# Altium PCB module-BGA_RG-4layers_v1.0.PcbDoc (part 1 of 3)
Units mm, origin at the board's own origin, x right, y up, seen from the top; angles counter-clockwise.
Board outline 20 x 20 mm, 4 copper layers (Top Layer, Signal Layer 1, Signal Layer 2, Bottom Layer), stack 1.546 mm thick; 75 components, 77 nets, 282 pads, 367 vias.
Unrouted connection lines stored in the file: 143.
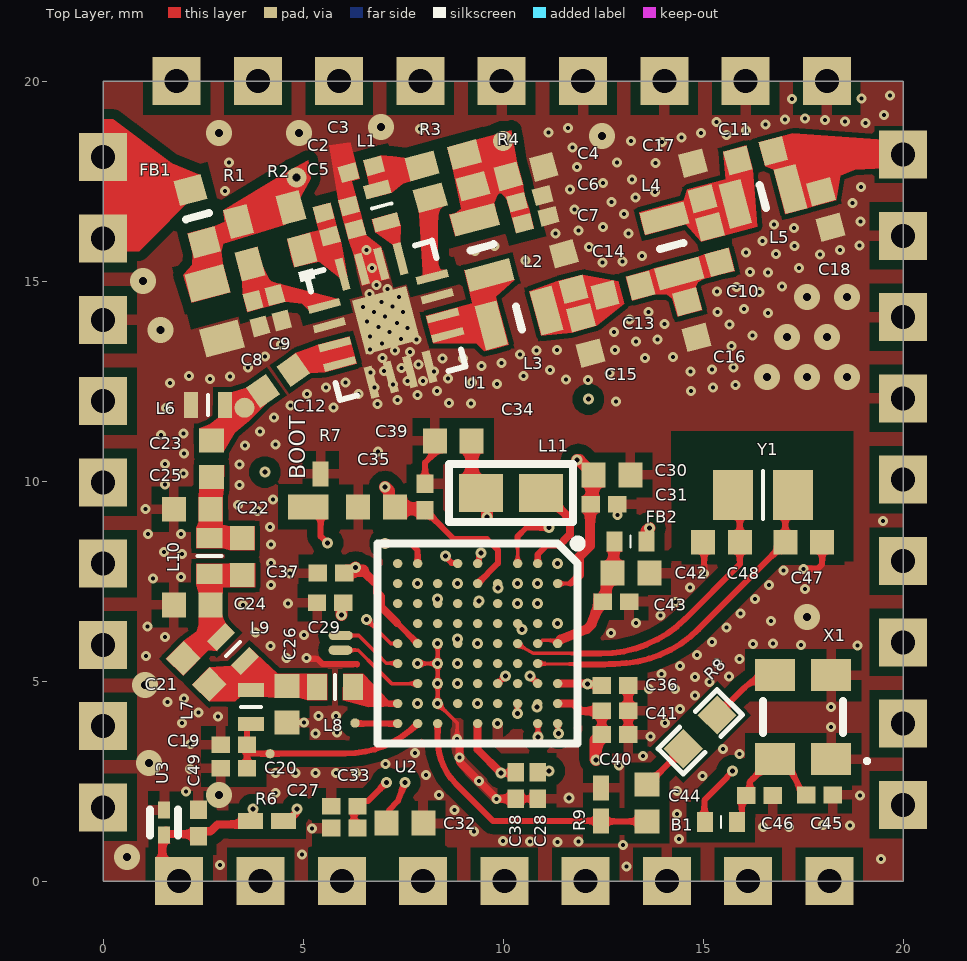
[diagram p0: Top Layer view]
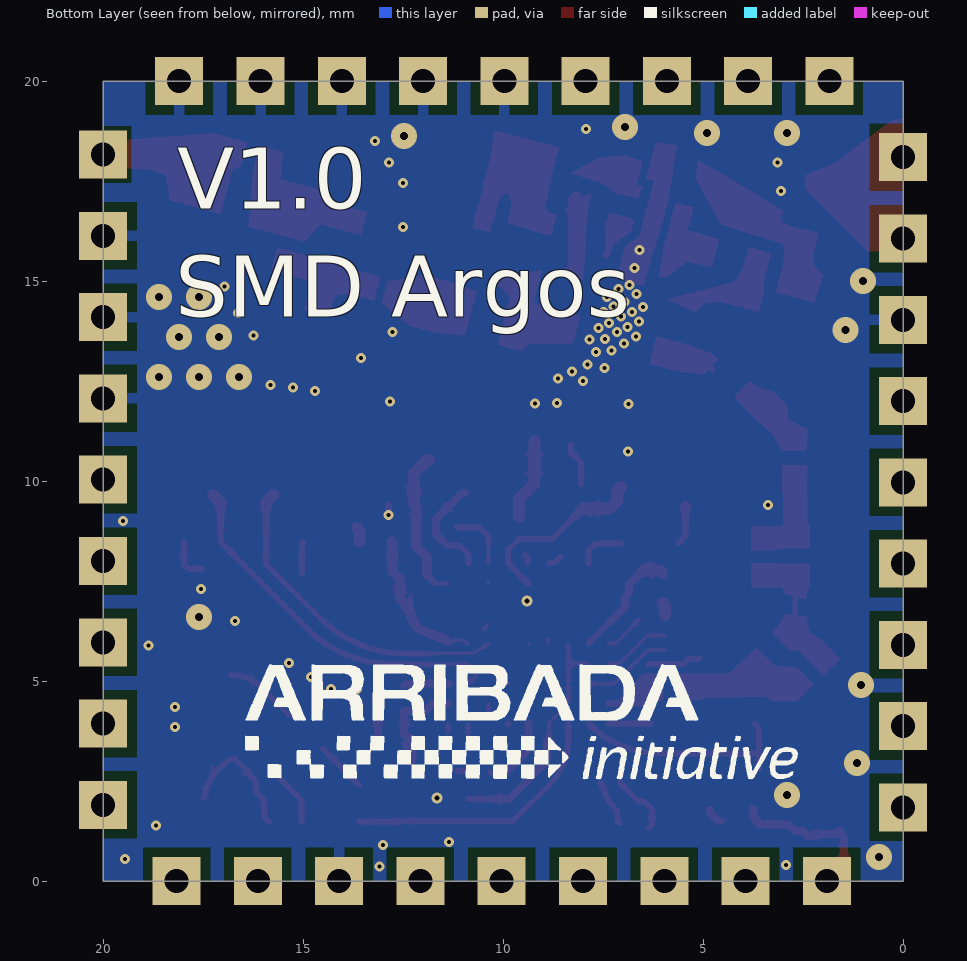
[diagram p1: Bottom Layer view, seen from below]
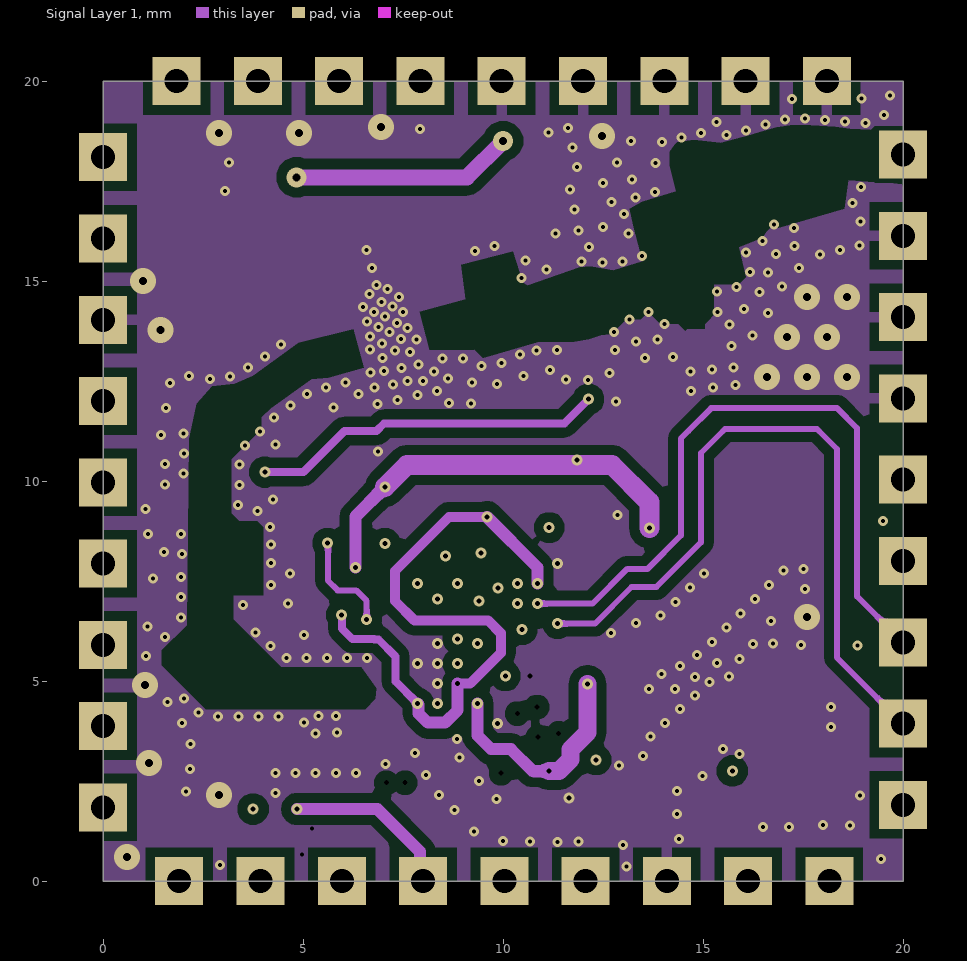
[diagram p2: Signal Layer 1]
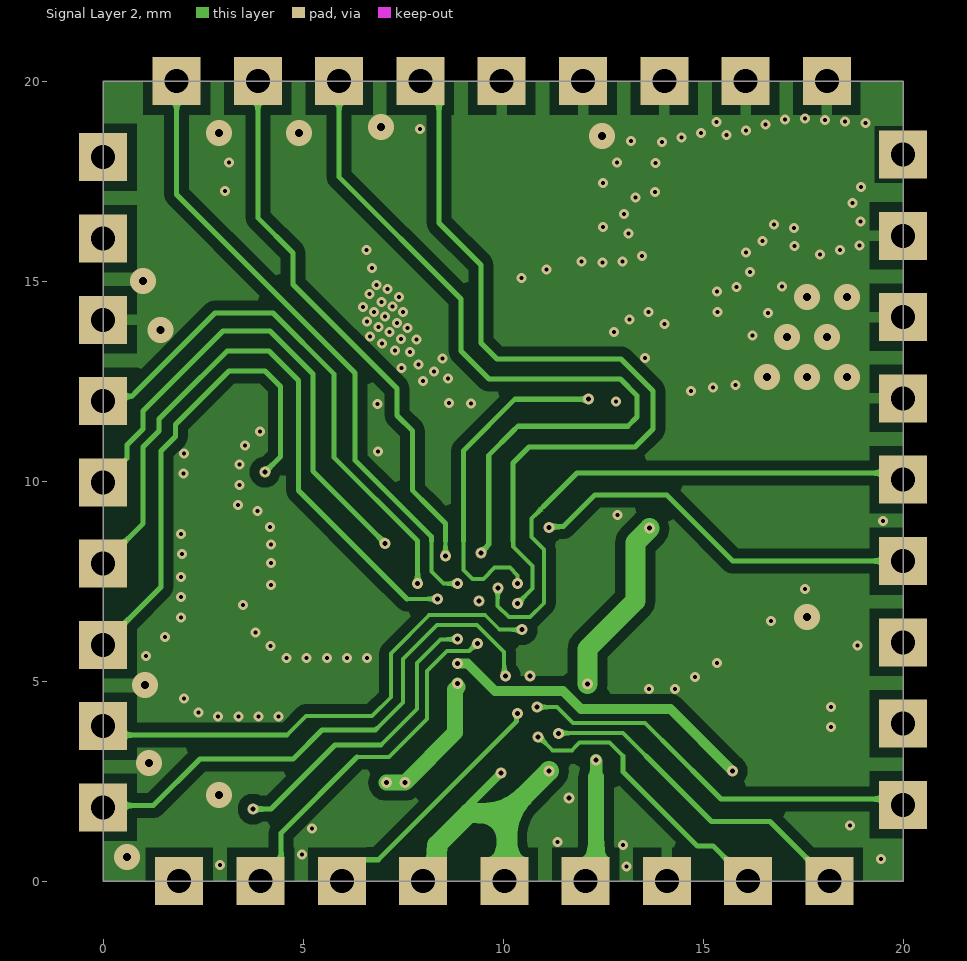
[diagram p3: Signal Layer 2]

## Layer stack, top to bottom
Top Solder: solder mask 0.02, Solder Resist, Dk 3.5
Top Layer: signal copper 0.035
Dielectric 1: prepreg 0.0705, PP-010, Dk 4
Signal Layer 1: signal copper 0.035
Dielectric 2: core 1.265, Core-002, Dk 4
Signal Layer 2: signal copper 0.035
Dielectric 3: prepreg 0.0705, PP-010, Dk 4
Bottom Layer: signal copper 0.035
Bottom Solder: solder mask 0.02, Solder Resist, Dk 3.5

## Board outline
0,0 20,0 20,20 0,20

## Design rules (kind name [scope] priority, off if disabled: settings)
BoardOutlineClearance [All] p1 off: gap=0.6 ignorepadtopadclearanceinfootprint=FALSE
Clearance Clearance_tab [(ObjectKind = 'Pad') And (Name Like 'Tab*-*') vs OnLayer('Keep-Out Layer')] p1: gap=0 ignorepadtopadclearanceinfootprint=TRUE
Clearance Clearance_RF_Polygon [InNetClass('50Ohms') vs InPolygon] p2: gap=0.12 ignorepadtopadclearanceinfootprint=TRUE
Clearance PairDiff [InNet('RFI_N') vs InNet('RFI_P')] p3: gap=0.1 ignorepadtopadclearanceinfootprint=TRUE
Clearance Clearance_1 [OnLayer('MidLayer 1')       and InPolygon vs All    and WithinRoom('RoomDefinition_BGA')] p4: gap=0.15 ignorepadtopadclearanceinfootprint=TRUE
Clearance Clearance_Via_BGA [TouchesRoom('RoomDefinition_BGA') vs isvia or ispad or istrack] p5: gap=0.085 ignorepadtopadclearanceinfootprint=TRUE except(0.09: Track-Track Track-Via; 0.1: Track-Poly Track-Region; 0.11: Arc-Via SMDPad-Via THPad-Via Via-Via; 0.12: Arc-Track; 0.15: Arc-Region SMDPad-Region THPad-Region Via-Fill Via-Poly Via-Region Fill-Hole Poly-Hole Region-Region; 0.24: Arc-Fill Arc-Poly Track-Fill SMDPad-Fill SMDPad-Poly THPad-Fill THPad-Poly Fill-Fill Fill-Poly Fill-Region Fill-Text Poly-Poly Poly-Region Poly-Text Region-Text Region-Hole)
Clearance Clearance_Via_BGA_Inner [TouchesRoom('RoomDefinition_BGA') and (OnLayer('MidLayer 1')) vs isvia or ispad or istrack] p6: gap=0.25 ignorepadtopadclearanceinfootprint=TRUE except(0.075: Track-Track Track-Via; 0.085: Arc-Arc Arc-SMDPad Arc-THPad Arc-Text Arc-Hole Track-SMDPad Track-THPad Track-Text Track-Hole SMDPad-SMDPad SMDPad-THPad SMDPad-Text SMDPad-Hole THPad-THPad THPad-Text THPad-Hole Via-Text Via-Hole Text-Text Text-Hole; 0.11: Arc-Via SMDPad-Via THPad-Via Via-Via; 0.12: Arc-Track; 0.15: Arc-Region Track-Region SMDPad-Region THPad-Region Via-Region Region-Region)
Clearance Clearance_via_to_via [(ObjectKind = 'Via') And (Net <> 'GND') vs (ObjectKind = 'Via') And (Net <> 'GND')] p7: gap=0.65 ignorepadtopadclearanceinfootprint=TRUE
Clearance "Clearance_Polygon to All" [InPolygon] p8: gap=0.25 ignorepadtopadclearanceinfootprint=TRUE
Clearance [All] p9: gap=0.12 ignorepadtopadclearanceinfootprint=TRUE except(0.25: Arc-Via Track-Via SMDPad-Via THPad-Via Via-Fill Via-Poly Via-Region)
ComponentClearance CASTELLATED_COL [(InComponent('J1') OR InComponent('J2') OR InComponent('J3') OR InComponent('J4'))] p1: gap=0 collisioncheckmode=3 verticalgap=0 showdistances=FALSE
ComponentClearance [All] p2: gap=0 collisioncheckmode=3 verticalgap=0.1 showdistances=FALSE
DiffPairsRouting [InDifferentialPair('RFI')] p1: maxlimit=0.2 minlimit=0.111 mostfreqgap=0.111 toplayer_minwidth=0.1 toplayer_maxwidth=0.145 toplayer_prefwidth=0.1 midlayer1_minwidth=0.1 midlayer1_maxwidth=0.145 midlayer1_prefwidth=0.1 midlayer2_minwidth=0.1 midlayer2_maxwidth=0.145 midlayer2_prefwidth=0.1 bottomlayer_minwidth=0.1 bottomlayer_maxwidth=0.145 bottomlayer_prefwidth=0.1 maxuncoupledlength=12.7
HoleSize [All] p1: absolutevalues=TRUE maxlimit=10 minlimit=0.025 maxpercent=80.000 minpercent=20.000
HoleToHoleClearance [All] p1: gap=0.1 allowstackedmicrovias=TRUE
MaxMinImpedance "Schematic Impedance Constraint" [InNetClass('50Ohms')] p1: minimum=50.00 maximum=50.00
MaximumViaCount [All] p1: limit=3
MinimumSolderMaskSliver [All] p1: minsoldermaskwidth=0.1
PlaneClearance PlaneClearance_1 [InNet('GND')] p1: clearance=0
PlaneClearance [All] p2: clearance=0.508
PlaneConnect [InNet('GND')] p1: planeconnectstyle=Direct reliefexpansion=0.508 reliefentries=4 reliefconductorwidth=0.21 reliefairgap=0.21
PolygonConnect PolygonConnectGnd [InNet('GND') vs InPolygon] p1: connectstyle=Direct reliefconductorwidth=0.254 reliefentries=4 polygonreliefangle="90 Angle" airgapwidth=0.254
PolygonConnect PolygonConnect_RF [(ObjectKind = 'Pad')    and       TouchesRoom('RF_ARTIC')] p2: connectstyle=Direct reliefconductorwidth=0.254 reliefentries=4 polygonreliefangle="90 Angle" airgapwidth=0.254
PolygonConnect PolygonConnect_J1 [(ObjectKind = 'Pad') And (Name = 'J1-2')] p3: connectstyle=Direct reliefconductorwidth=0.254 reliefentries=4 polygonreliefangle="90 Angle" airgapwidth=0.254
PolygonConnect PolygonConnect_All [All] p4: thpad.connectstyle=Relief thpad.reliefconductorwidth=0.25 thpad.reliefentries=4 thpad.polygonreliefangle="90 Angle" thpad.airgapwidth=0.25 smdpad.connectstyle=Relief smdpad.reliefconductorwidth=0.25 smdpad.reliefentries=4 smdpad.polygonreliefangle="90 Angle" smdpad.airgapwidth=0.25 via.connectstyle=Direct via.reliefconductorwidth=0.2 via.reliefentries=4 via.polygonreliefangle="90 Angle" via.airgapwidth=0.25
RoomDefinition RF_ARTIC [InComponentClass('RF_ARTIC')] p1: confinementstyle=ConfineIn formatcopy=TRUE lockcomponents=FALSE outline 0.85,18.944 0.862,18.957 18.856,18.957 18.95,18.85 18.95,12.166 18.144,11.25 1.196,11.25 0.85,11.643 0.85,14.749
RoomDefinition RoomDefinition_BGA [False] p2: confinementstyle=ConfineIn formatcopy=TRUE lockcomponents=FALSE outline 6.851,8.49 6.861,8.5 11.9,8.5 11.9,3.4 6.85,3.4
RoomDefinition STM32 [InComponentClass('STM32')] p3: confinementstyle=ConfineIn formatcopy=TRUE lockcomponents=FALSE outline 19.994,0.01 19.994,11.5 0,11.5 0,0.01
RoutingLayers "RoutingLayers_90 Ohms" [InDifferentialPairClass('All Differential Pairs')] p1: top layer_v5=TRUE mid layer 1_v5=TRUE mid layer 2_v5=TRUE bottom layer_v5=TRUE
RoutingLayers [All] p2: top layer_v5=TRUE mid layer 1_v5=TRUE mid layer 2_v5=TRUE bottom layer_v5=TRUE
RoutingVias RoutingVias_BGA [InDrillLayerPair('Top Layer - MidLayer 1')] p1: holewidth=0.125 width=0.25 viastyle="Through Hole" minholewidth=0.125 minwidth=0.23 maxholewidth=0.125 maxwidth=0.27
RoutingVias [All] p2: holewidth=0.2 width=0.65 viastyle="Through Hole" minholewidth=0.1 minwidth=0.2 maxholewidth=0.2 maxwidth=0.65
ShortCircuit [(ObjectKind = 'Via') And (DrillPair = 'Top Layer - MidLayer 1') vs Ispad] p1: allowed=TRUE
SilkToSilkClearance [All] p1: silktosilkclearance=0
SilkToSolderMaskClearance [IsPad] p1: minsilkscreentomaskgap=0.1 clearancetoexposedcopper=TRUE
SolderMaskExpansion SolderMaskExpansion_VIA [IsVia] p1: expansion=-0.2 istentingtop=FALSE
SolderMaskExpansion [All] p2: expansion=0 istentingtop=FALSE
UnRoutedNet [All] p1: checkbadconnections=TRUE
Width Width_50Ohms [InNetClass('50Ohms')] p1: maxlimit=0.709 minlimit=0.065 preferedwidth=0.3 toplayer_minwidth=0.1 toplayer_prefwidth=0.606 impedanceprofiledriven=TRUE impedanceprofileid={08010320-1712-4E40-B560-D84C871F8A27} impedanceprofilevalue=50.000000 minimp=50.000000 maximp=50.000000 favimp=50.000000
Width Width_GPIO [InNetClass('PA[0..15]') or InNetClass('PB[0..15]')or InNetClass('Pc[0..15]')] p2: maxlimit=0.254 minlimit=0.08 preferedwidth=0.127 minimp=50.000000 maximp=50.000000 favimp=50.000000
Width Width_BGA [OnLayer('Top Layer')      and WithinRoom('RoomDefinition_BGA')] p3: maxlimit=0.35 minlimit=0.075 preferedwidth=0.1 toplayer_minwidth=0.08 toplayer_prefwidth=0.09 midlayer1_maxwidth=0.1 midlayer2_minwidth=0.09 midlayer2_maxwidth=0.1 bottomlayer_minwidth=0.09 bottomlayer_maxwidth=0.1 minimp=50.000000 maximp=50.000000 favimp=50.000000
Width Width_ALIMS [InNetClass('VDD') and InNetClass('VDDPA') and InNetClass('VBAT')] p4: maxlimit=10 minlimit=0.15 preferedwidth=0.35 minimp=50.000000 maximp=50.000000 favimp=50.000000
Width Width_GR_POW [WithinRoom('RF_ARTIC') And TouchesRoom('RF_ARTIC')] p5: maxlimit=10 minlimit=0.127 preferedwidth=0.3 toplayer_minwidth=0.2 bottomlayer_minwidth=0.2 minimp=50.000000 maximp=50.000000 favimp=50.000000
Width Width_GND [InNet('VSSSMPS')] p6: maxlimit=10 minlimit=0.12 preferedwidth=0.3 midlayer1_minwidth=0.2 midlayer2_minwidth=0.2 bottomlayer_minwidth=0.2 minimp=50.000000 maximp=50.000000 favimp=50.000000
Width [All] p7: maxlimit=2 minlimit=0.075 preferedwidth=0.15 toplayer_minwidth=0.08 toplayer_maxwidth=1.5 midlayer1_maxwidth=1 midlayer2_minwidth=0.1 bottomlayer_minwidth=0.1 bottomlayer_maxwidth=1.5 minimp=50.000000 maximp=50.000000 favimp=50.000000
18 further rules are at their usual default settings.

## Classes and differential pairs
net class GR_EN: NetC2_1 NetC8_2 V_EN1
component class STM32: B1 C35 C36 C37 C38 C39 C40 C41 C42 C43 C44 C45 C46 C47 C48 C49 FB2 R8 R9 U2 U3 X1 Y1
component class U_STM32RF_power_SMPS: C27 C28 C29 C30 C31 C32 C33 C34 L11
component class RF_ARTIC: ala C2 C3 C4 C5 C6 C7 C8 C9 C10 C11 C12 C13 C14 C15 C16 C17 C18 FB1 L1 L2 L4 L5 L6 R1 R2 R3 R4
component class U_module-BGA-RG: C19 C20 C21 C22 C23 C24 C25 C26 L7 L8 L9 L10 R6 R7
net class PC[0..15]: PC0 PC1 PC2 PC3 PC4 PC5 PC6 PC7 PC8 PC9 PC10 PC11 PC12 PC13 PC14 PC15
net class PB[1..15]: PB1 PB2 PB3 PB4 PB5 PB6 PB7 PB8 PB9 PB10 PB11 PB12 PB13 PB14 PB15
net class PA[0..15]: PA0 PA1 PA2 PA3 PA4 PA5 PA6 PA7 PA8 PA9 PA10 PA11 PA12 PA13 PA14 PA15
net class 50Ohms: ANT_ARGOS_2 GRF_IN_4 GRF_OUT_4 NetC10_1 NetC10_2 NetC13_1 NetC21_1 NetC21_2 NetC22_2 RFIN RFO_LP

## Components (designator, comment, footprint, x,y, rotation, side; value= is the part's Value field where it differs from the comment)
B1 "1000u@100MHz" NFZ15SG152SN10B 15.445,1.472 r180 top
C2 "100nF" CAPC0603X33N 5.832,16.791 r15 top
C3 "100nF" CAPC0603X33N 6.456,17.795 r195 top
C4 "1uF" CAPC1005X55N 10.571,17.737 r15 top
C5 "100pF" CAPC0603X33N 5.988,16.208 r15 top
C6 "100nF" CAPC0603X33N 10.673,17.054 r15 top
C7 "100pF" CAPC0603X33N 10.817,16.531 r15 top
C8 "100nF" CAPC0603X33N 3.836,14.186 r105 top
C9 "100pF" CAPC0603X33N 4.381,14.332 r105 top
C10 "GRM1555C1H4R3BA01D" CAPC1005X55N 15.297,15.909 r105 top value=4.3pF
C11 "GRM1555C1E3R9BA01D" CAPC1005X55N 16.315,18.131 r15 top value=3.9pF
C12 "20pF" CAPC1005X55N 4.377,12.514 r35 top
C13 "GCM1555C1H101JA16D" CAPC1005X55N 12.993,14.771 r15 top value=100pF
C14 "20pF" CAPC1005X55N 11.638,15.237 r105 top
C15 "GCM1555C1H8R2CA16J" CAPC1005X55N 12.065,13.643 r105 top value=8.2pF
C16 "CAP-NC-0402" CAPC1005X55N 14.716,14.038 r105 top value=NC
C17 "GRM1555C1E6R8BA01D" CAPC1005X55N 14.87,17.503 r285 top value=6.8pF
C18 "GRM1555C2A2R7CA01D" CAPC1005X55N 18.068,16.788 r105 top value=2.7pF
C19 "100nF" CAPC0603X33N 3.27,3.405 r0 top (schematic designator C1)
C20 "100pF" CAPC0603X33N 3.27,2.818 r0 top (schematic designator C2)
C21 "GRM1555C1H4R3BA01D" CAPC1005X55N 2.332,5.243 r135 top value=4.3pF (schematic designator C3)
C22 "CAP-NC-0402" CAPC1005X55N 3.479,8.111 r90 top value=NC (schematic designator C4)
C23 "GCM1555C1H101JA16D" CAPC1005X55N 2.713,10.558 r90 top value=100pF (schematic designator C5)
C24 "GCM1555C1H120GA16D" CAPC1005X55N 2.232,6.903 r0 top value=12pF (schematic designator C6)
C25 "GCM1555C1H8R2CA16J" CAPC1005X55N 2.232,9.296 r0 top value=8.2pF (schematic designator C7)
C26 "GRM1555C1H130GA01D" CAPC1005X55N 4.6,4.42 r90 top value=13pF (schematic designator C8)
C27 "100pF" CAPC0603X33N 6.031,1.87 r0 top (schematic designator C1)
C28 "GRM033R61C104KE14D" CAPC0603X33N 10.87,2.386 r270 top value=100nF (schematic designator C2)
C29 "GRM033R61C104KE14D" CAPC0603X33N 5.679,6.956 r180 top value=100nF (schematic designator C3)
C30 "GRM155Z71A225KE44D" CAPC1005X55N 12.726,10.152 r0 top value=2.2uF (schematic designator C4)
C31 "100nF" CAPC0603X33N 12.526,9.418 r180 top (schematic designator C5)
C32 "1uF" CAPC1005X55N 7.55,1.45 r180 top (schematic designator C6)
C33 "100nF" CAPC0603X33N 6.031,1.324 r0 top (schematic designator C7)
C34 "0.47uF" CAPC1005X55N 8.753,11.004 r180 top value=470nF (schematic designator C8)
C35 "GRM155Z71A225KE44D" CAPC1005X55N 6.84,9.35 r0 top value=2.2uF (schematic designator C1)
C36 "100nF" CAPC0603X33N 12.8,4.89 r180 top (schematic designator C2)
C37 "100nF" CAPC0603X33N 5.7,7.7 r0 top (schematic designator C3)
C38 "100nF" CAPC0603X33N 10.32,2.386 r90 top (schematic designator C4)
C39 "100nF" CAPC0603X33N 8.05,9.6 r270 top (schematic designator C5)
C40 "1uF" CAPC0603X35N 12.8,3.66 r180 top (schematic designator C6)
C41 "100nF" CAPC0603X33N 12.8,4.255 r0 top (schematic designator C7)
C42 "GRM155Z71A225KE44D" CAPC1005X55N 13.2,7.7 r180 top value=2.2uF (schematic designator C8)
C43 "100nF" CAPC0603X33N 12.826,6.983 r180 top (schematic designator C9)
C44 "10pF" CAPC1005X55N 13.6,1.95 r270 top (schematic designator C10)
C45 "1uF" CAPC0603X35N 17.912,2.152 r0 top (schematic designator C11)
C46 "100nF" CAPC0603X33N 16.411,2.136 r0 top (schematic designator C12)
C47 "5.1pF" CAPC1005X55N 17.518,8.47 r180 top (schematic designator C13)
C48 "5.1pF" CAPC1005X55N 15.461,8.47 r0 top (schematic designator C14)
C49 "100nF" CAPC0603X33N 2.383,1.45 r270 top (schematic designator C15)
FB1 "BLM15PE800SH1D" BLM18EG121SH1D 2.359,16.621 r285 top
FB2 "600R@100MHz" NFZ15SG152SN10B 13.186,8.488 r180 top (schematic designator FB1)
L1 "10nH" LQG15WH0N7B02D 6.968,16.879 r105 top
L2 "24nH" LQW18AN10NG80D 9.477,15.843 r285 top
L3 "LQW18AN5N6C80D" LQW18AN10NG80D 10.396,14.076 r15 top value=5.6nH
L4 "10nH" LQW18AN10NG80D 14.219,15.878 r105 top
L5 "10nH" LQW18AN10NG80D 16.494,17.114 r15 top
L6 "10nH" LQG15WH0N7B02D 2.625,11.9 r0 top
L7 "LQG15HN68NJ02D" LQG15WH0N7B02D 3.7,4.35 r90 top value=68nH (schematic designator L1)
L8 "LQG15WZ11NJ02D" LQW15CNR20J00B 5.8,4.85 r180 top value=11nH (schematic designator L2)
L9 "10nH" LQG15WH0N7B02D 3.253,5.801 r135 top (schematic designator L3)
L10 "LQG15WH20NJ02D" LQW15CNR20J00B 2.662,8.125 r90 top value=20nH (schematic designator L4)
L11 "MLZ1608M150WT000" INDC1608X95N 10.2,9.7 r180 top value=15µH (schematic designator L1)
R1 "2.4K" RESC1005X40N 3.53,15.959 r105 top value=2.4kR
R2 "5.42K" RESC1005X40N 4.84,16.312 r105 top value=5.42kR
R3 "0R" RESC1005X40N 8.503,18.02 r15 top value=0mR
R4 "0R" RESC1005X40N 8.712,17.226 r15 top value=0mR
R6 "100K" RESC0603X28N 4.1,1.5 r180 top (schematic designator R2)
R7 "100K" RESC0603X28N 5.44,9.765 r270 top (schematic designator R3)
R8 "220R" 0402 15.375,4.175 r225 top (schematic designator R1)
R9 "10K" RESC0603X28N 12.45,1.914 r270 top value=10kR (schematic designator R2)
U1 "GRF5504" QFN-16_3MM_GRF 7.075,14.016 r15 top
U2 "STM32WL55JCI7_details" BGA73C50P9X9_500X500X60 9.366,5.937 r270 top (schematic designator U1)
U3 "ESD_6V" DIOM0603X03N 1.53,1.467 r90 top (schematic designator U2)
X1 "TG2520SMN_32.0000M-MCGNNM0" TG2520SMN320000MMCGNNM0 17.5,4.1 r90 top
Y1 "NX2012SA-32.768K-STD-MUB-1" NX2012SA32768KSTDMUB1 16.5,9.65 r180 top

## Footprints (in the part's own frame and the unit in brackets; to place one, negate y for a bottom-side part, rotate by r counter-clockwise, add the part's x,y. Pads: shape width x height; smd on the part's side, far side on the other; paste and mask are expansions set on the pad)
0402 [mm]
  rect 0.7x0.7 smd: 1(0.035,0) 2(1.233,0)
  silkscreen extent -0.41,-0.45 1.67,0.45, body extent -0.38,-0.36 1.65,0.36, height 0.82
BGA73C50P9X9_500X500X60 [mm]
  round 0.232 smd mask+0.02: A1(-2,2) A2(-1.5,2) A4(-0.5,2) A5(0,2) A7(1,2) A8(1.5,2) A9(2,2) B1(-2,1.5) B2(-1.5,1.5) B3(-1,1.5) B4(-0.5,1.5) B5(0,1.5) B6(0.5,1.5) B7(1,1.5) B8(1.5,1.5) B9(2,1.5) C1(-2,1) C2(-1.5,1) C3(-1,1) C4(-0.5,1) C5(0,1) C6(0.5,1) C7(1,1) C8(1.5,1) D2(-1.5,0.5) D3(-1,0.5) D4(-0.5,0.5) D5(0,0.5) D6(0.5,0.5) D7(1,0.5) D8(1.5,0.5) D9(2,0.5) E1(-2,0) E2(-1.5,0) E3(-1,0) E4(-0.5,0) E5(0,0) E6(0.5,0) E7(1,0) E8(1.5,0) E9(2,0) F1(-2,-0.5) F2(-1.5,-0.5) F3(-1,-0.5) F4(-0.5,-0.5) F5(0,-0.5) F6(0.5,-0.5) F7(1,-0.5) F8(1.5,-0.5) G2(-1.5,-1) G3(-1,-1) G4(-0.5,-1) G5(0,-1) G6(0.5,-1) G7(1,-1) G8(1.5,-1) G9(2,-1) H1(-2,-1.5) H2(-1.5,-1.5) H3(-1,-1.5) H4(-0.5,-1.5) H5(0,-1.5) H6(0.5,-1.5) H7(1,-1.5) H8(1.5,-1.5) H9(2,-1.5) J1(-2,-2) J2(-1.5,-2) J3(-1,-2) J5(0,-2) J6(0.5,-2) J8(1.5,-2) J9(2,-2)
  silkscreen extent -2.6,-2.5 2.5,2.6, body extent -2.5,-2.5 2.5,2.5, height 0.6
BLM18EG121SH1D [mm]
  rect 0.65x0.7 smd: 1(-0.675,0) 2(0.675,0)
  silkscreen extent 0,-0.3 0,0.3, body extent -0.8,-0.4 0.8,0.4, height 0.8
CAPC0603X33N [mm]
  rect 0.46x0.42 smd: 1(-0.33,0) 2(0.33,0)
  body extent -0.3,-0.15 0.3,0.15, height 0.33
CAPC0603X35N [mm]
  rect 0.46x0.42 smd: 1(-0.33,0) 2(0.33,0)
  body extent -0.3,-0.15 0.3,0.15, height 0.35
CAPC1005X55N [mm]
  rect 0.6x0.62 smd: 1(-0.46,0) 2(0.46,0)
  body extent -0.5,-0.25 0.5,0.25, height 0.55
DIOM0603X03N [mm] "Molded Diode, 2-Leads, Body 0.60x0.30mm"
  rect 0.425x0.3 smd: 1(-0.313,0) 2(0.312,0)
  silkscreen extent -0.32,-0.35 0.32,0.35, body extent -0.32,-0.18 0.33,0.18, height 0.33
INDC1608X95N [mm] "Chip Inductor, 2-Leads, Body 1.75x0.95x0.95mm (0603)"
  rect 1.1x0.95 smd: 1(-0.75,0) 2(0.75,0)
  silkscreen extent -1.55,-0.73 1.55,0.72, body extent -0.8,-0.48 0.8,0.47, height 0.8
LQG15WH0N7B02D [mm]
  rect 0.35x0.65 smd: 1(-0.425,0) 2(0.425,0)
  silkscreen extent 0,-0.25 0,0.25, body extent -0.5,-0.25 0.5,0.25, height 0.55
LQW15CNR20J00B [mm]
  rect 0.5x0.66 smd: 1(-0.45,0) 2(0.45,0)
  silkscreen extent 0,-0.3 0,0.3, body extent -0.5,-0.25 0.5,0.25, height 0.6
LQW18AN10NG80D [mm]
  rect 0.57x1.15 smd: 1(-0.715,0) 2(0.715,0)
  silkscreen extent 0,-0.3 0,0.3, body extent -0.83,-0.5 0.82,0.49, height 0.9
NFZ15SG152SN10B [mm]
  rect 0.4x0.5 smd: 1(-0.4,0) 2(0.4,0)
  silkscreen extent 0,-0.15 0,0.15, body extent -0.5,-0.25 0.5,0.25, height 0.5
NX2012SA32768KSTDMUB1 [mm]
  rect 1x1.25 smd: 1(-0.75,0) 2(0.75,0)
  silkscreen extent 0,-0.6 0,0.6, body extent -1.02,-0.6 1.03,0.6, height 0.55
QFN-16_3MM_GRF [mil]
  rect 32x8 smd paste+0 mask+1.18: 1(-55,29.53) 2(-55,9.84) 3(-55,-9.84) 4(-55,-29.53) 9(55,-29.53) 10(55,-9.84) 11(55,9.84) 12(55,29.53)
  rect 8x32 smd paste+0 mask+1.18: 5(-29.53,-55) 6(-9.84,-55) 7(9.84,-55) 8(29.53,-55) 13(29.53,55) 14(9.84,55) 15(-9.84,55) 16(-29.53,55)
  rect 55x55 smd paste+0 mask+0: 17(0,0)
  silkscreen extent -71,-64 64,68, body extent -59,-59 59,59, height 35
RESC0603X28N [mm]
  rect 0.625x0.4 smd: 1(-0.412,0) 2(0.412,0)
  body extent -0.3,-0.15 0.3,0.15, height 0.28
RESC1005X40N [mm]
  rect 0.75x0.6 smd: 1(-0.55,0) 2(0.55,0)
  body extent -1,0 0,0.35, height 0.5
TG2520SMN320000MMCGNNM0 [mm]
  rect 0.8x1 smd: 1(-1.05,-0.7) 2(1.05,-0.7) 3(1.05,0.7) 4(-1.05,0.7)
  silkscreen extent -1.15,-1.65 0.4,1, body extent -1.37,-1.12 1.37,1.12, height 0.9

## Part data
B1: library part BLM15HG102SZ1D, "Ferrite Bead - BLM15_Z1D Series EMI Suppression Filter 1000+/-25% at 100MHz 250mA @85", Manufacturer_Name="Murata Electronics", Mouser Part Number=81-BLM15HG102SZ1D, Datasheet Link=http://www.murata.com/~/media/webrenewal/support/library/catalog/products/emc/emifil/c31e.ashx?la=en-gb, Geometry.Height=0.55mm, Manufacturer_Part_Number=BLM15HG102SZ1D, Mouser Price/Stock=https://www.mouser.co.uk/ProductDetail/Murata-Electronics/BLM15HG102SZ1D?qs=lEfY3O89Aqlr%2F6qMRIRYKQ%3D%3D
C2 C3 C6 C8 C19 C31 C33 C36 C37 C38 C39 C41 C43 C46 C49: library part GRM033Z71C104KE14D, "Multilayer Ceramic Capacitors MLCC - SMD/SMT .1UF     16V   10%        0201", Case/Package=0201, Manufacturer 1=Murata, Manufacturer_Name="Murata Electronics", Mouser Part Number=81-GRM033Z71C104KE4D, Category 1="Ceramic Capacitors", Datasheet Link=http://www.murata.com/~/media/webrenewal/support/library/catalog/products/capacitor/mlcc/c02e.pdf, Description 1="Cap Ceramic 0.1uF 16V X7R 10% Pad SMD 0201 125C T/R", Geometry.Height=0.33mm, Manufacturer Part Number 1=GRM033Z71C104KE14D, Manufacturer_Part_Number=GRM033Z71C104KE14D, Mouser Price/Stock=https://www.mouser.co.uk/ProductDetail/Murata-Electronics/GRM033Z71C104KE14D?qs=lEfY3O89AqkdMqrSfAAk2w%3D%3D, Pricing 1="1=0,1, 10=0,017, 50=0,017, 100=0,01, 1000=0,008, 10000=0,006 (USD)", RoHS 1=Yes, RoHS Compliant=Yes, Stock 1=739403, Supplier 1=Mouser, Supplier Part Number 1=81-GRM033Z71C104KE4D
C4 C32: library part GRM155Z71A105KE01J, "Multilayer Ceramic Capacitors MLCC - SMD/SMT 1.0UF 10V 10% 0402", Manufacturer 1=Murata, Manufacturer_Name="Murata Electronics", Mouser Part Number=81-GRM155Z71A105KE1J, Arrow Part Number=GRM155Z71A105KE01J, Arrow Price/Stock=https://www.arrow.com/en/products/grm155z71a105ke01j/murata-manufacturing?region=nac, Category 1="Ceramic Capacitors", Datasheet Link=http://www.murata.com/~/media/webrenewal/support/library/catalog/products/capacitor/mlcc/c02e.pdf, Description 1="Multi-Layer Ceramic Capacitor 1uF X7R 10% 0402 Paper T/R", Height=0.55mm, Manufacturer Part Number 1=GRM155Z71A105KE01J, Manufacturer_Part_Number=GRM155Z71A105KE01J, Mouser Price/Stock=https://www.mouser.co.uk/ProductDetail/Murata-Electronics/GRM155Z71A105KE01J?qs=xZ%2FP%252Ba9zWqaF%2FmyRgV0iOA%3D%3D, Pricing 1="1=0,1, 10=0,069, 50=0,069, 100=0,031, 1000=0,018, 10000=0,013 (USD)", RoHS 1=Yes, Stock 1=804340, Supplier 1=Mouser, Supplier Part Number 1=81-GRM155Z71A105KE1J
C5 C7 C9 C20: library part GRM0335C1E101JA01D, "Multilayer Ceramic Capacitors MLCC - SMD/SMT 100PF 25V 5% 0201", Case Code (Imperial)=0201, Case Code (Metric)=0603, Dielectric=C0G, Manufacturer 1=Murata, Manufacturer_Name="Murata Electronics", Max Operating Temperature=125°C, Min Operating Temperature=-55°C, Mouser Part Number=81-GRM0335C1E101JA1D, Package Quantity=1, Tolerance=5%, Voltage=25V, Arrow Part Number=GRM0335C1E101JA01D, Arrow Price/Stock=https://www.arrow.com/en/products/grm0335c1e101ja01d/murata-manufacturing, Capacitance=100pF, Case/Package=0201, Category 1="Ceramic Capacitors", ComponentLink1Description=https://datasheet.ciiva.com/16497/grm0335c1e101ja01-01-16497112.pdf?src-supplier=Future+Electronics, ComponentLink1URL=https://datasheet.ciiva.com/16497/grm0335c1e101ja01-01-16497112.pdf?src-supplier=Future+Electronics, ComponentLink2Description=https://datasheet.ciiva.com/18697/product-18697797.pdf?src-supplier=Digi-Key, ComponentLink2URL=https://datasheet.ciiva.com/18697/product-18697797.pdf?src-supplier=Digi-Key, Construction=Flat, Datasheet Link=http://www.murata.com/~/media/webrenewal/support/library/catalog/products/capacitor/mlcc/c02e.pdf, Depth=0.3mm, Description 1="0201 100 pF 25 V ±5% Tolerance C0G SMT Multilayer Ceramic Capacitor", Height=0.33mm, Lead Free="Lead Free", Length=0.6mm, Manufacturer Part Number 1=GRM0335C1E101JA01D, Manufacturer_Part_Number=GRM0335C1E101JA01D, Mount="Surface Mount", Mouser Price/Stock=https://www.mouser.co.uk/ProductDetail/Murata-Electronics/GRM0335C1E101JA01D?qs=lsk7mV%2FgRRIhY4z12C%2FxnQ%3D%3D, Packaging="Tape and Reel", Pricing 1="1=0,1, 10=0,006, 50=0,006, 100=0,004, 1000=0,003, 10000=0,003 (USD)", Radiation Hardening=No, Reach SVHC Compliant=No, RoHS 1=Yes, RoHS Compliant=Yes, Series=GRM, Stock 1=2143436, Supplier 1=Mouser, Supplier Part Number 1=81-GRM0335C1E101JA1D, Termination=SMD/SMT, Thickness=0.013inch, Voltage Rating=25V, Voltage Rating (DC)=25V, Width=0.012inch
C10 C21: "Multilayer Ceramic Capacitors MLCC - SMD/SMT 4.3 pF 50 VDC 0.1 pF 0402 C0G (NP0)", Capacitance=4.3pF, Case Code (Imperial)=0402, Case Code (Metric)=1005, Dielectric=C0G, Manufacturer 1=Murata, Max Operating Temperature=125°C, Min Operating Temperature=-55°C, Package Quantity=1, Supplier Part Number 1=490-6243-1-ND, Voltage=50V, Case/Package=0402, Category 1="Ceramic Capacitors", ComponentLink1Description=https://datasheet.ciiva.com/6270/grm1555c1h4r1wa01-01-6270851.pdf?src-supplier=Digi-Key, ComponentLink1URL=https://datasheet.ciiva.com/6270/grm1555c1h4r1wa01-01-6270851.pdf?src-supplier=Digi-Key, ComponentLink2Description=https://datasheet.ciiva.com/11613/product-11613482.pdf?src-supplier=Avnet, ComponentLink2URL=https://datasheet.ciiva.com/11613/product-11613482.pdf?src-supplier=Avnet, ComponentLink3Description=https://datasheet.ciiva.com/18184/getdatasheetpartid-319930-18184404.pdf?src-supplier=Verical, ComponentLink3URL=https://datasheet.ciiva.com/18184/getdatasheetpartid-319930-18184404.pdf?src-supplier=Verical, ComponentLink4Description=https://datasheet.ciiva.com/6270/partnumbering-e-01-6270857.pdf?src-supplier=Digi-Key, ComponentLink4URL=https://datasheet.ciiva.com/6270/partnumbering-e-01-6270857.pdf?src-supplier=Digi-Key, ComponentLink5Description=https://datasheet.ciiva.com/6270/partnumbering-e-01-6270860.pdf?src-supplier=Digi-Key, ComponentLink5URL=https://datasheet.ciiva.com/6270/partnumbering-e-01-6270860.pdf?src-supplier=Digi-Key, Construction=Flat, Depth=0.5mm, Description 1="CAP CER 4.3PF 50V C0G/NP0 0402", Height=0.5mm, Lead Free="Lead Free", Length=1mm, Manufacturer Part Number 1=GRM1555C1H4R3BA01D, Mount="Surface Mount", Packaging="Tape and Reel", Pricing 1="1=0,1, 10=0,051, 50=0,0278, 100=0,0227, 500=0,01624, 1000=0,01276, 2500=0,0116, 5000=0,01067 (USD)", Radiation Hardening=No, RoHS 1=Yes, RoHS Compliant=Yes, Series=GRM, Stock 1=166304, Supplier 1=Digi-Key, Termination=SMD/SMT, Thickness=0.022inch, Voltage Rating=50V, Voltage Rating (DC)=50V, Width=0.02inch
C11: "Multilayer Ceramic Capacitors MLCC - SMD/SMT 3.9 pF 25 VDC 0.1 pF 0402 C0G (NP0)", Capacitance=3.9pF, Case Code (Imperial)=0402, Case Code (Metric)=1005, Dielectric=C0G, Manufacturer 1=Murata, Max Operating Temperature=125°C, Min Operating Temperature=-55°C, Package Quantity=10000, Supplier Part Number 1=81-GRM1555C1E3R9BA1D, Voltage Rating=25V, Case/Package=0402, Category 1="Ceramic Capacitors", ComponentLink1Description=https://datasheet.ciiva.com/11613/product-11613797.pdf?src-supplier=Avnet, ComponentLink1URL=https://datasheet.ciiva.com/11613/product-11613797.pdf?src-supplier=Avnet, ComponentLink2Description=https://datasheet.ciiva.com/29538/grm1555c1e3r9ba01-01-29538319.pdf?src-supplier=Digi-Key, ComponentLink2URL=https://datasheet.ciiva.com/29538/grm1555c1e3r9ba01-01-29538319.pdf?src-supplier=Digi-Key, Construction=Flat, Depth=0.5mm, Description 1="CAP CER 3.9PF 25V NP0 0402", Height=0.5mm, Length=1mm, Manufacturer Part Number 1=GRM1555C1E3R9BA01D, Mount="Surface Mount", Packaging="Tape and Reel", Pricing 1="1=0,1, 10=0,056, 50=0,056, 100=0,026, 1000=0,015, 10000=0,01 (USD)", Radiation Hardening=No, RoHS 1=Yes, RoHS Compliant=Yes, Series=GRM, Stock 1=18288, Supplier 1=Mouser, Termination=SMD/SMT, Thickness=0.022inch, Voltage Rating (DC)=25V, Width=0.5mm
C12 C14: library part GRM1555C1H200GA01D, "Multilayer Ceramic Capacitors MLCC - SMD/SMT 20 pF 50 VDC 2% 0402 C0G (NP0)", Case Code (Imperial)=0402, Case Code (Metric)=1005, Dielectric=C0G, Manufacturer 1=Murata, Max Operating Temperature=125°C, Min Operating Temperature=-55°C, Package Quantity=1, Supplier Part Number 1=81-GRM1555C1H200GA1D, Tolerance=2%, Voltage=50V, Capacitance=20pF, Case/Package=0402, Category 1="Ceramic Capacitors", ComponentLink1Description=https://datasheet.ciiva.com/6270/grm1555c1h200ga01-01-6270705.pdf?src-supplier=Digi-Key, ComponentLink1URL=https://datasheet.ciiva.com/6270/grm1555c1h200ga01-01-6270705.pdf?src-supplier=Digi-Key, ComponentLink2Description=https://datasheet.ciiva.com/11609/product-11609354.pdf?src-supplier=Avnet, ComponentLink2URL=https://datasheet.ciiva.com/11609/product-11609354.pdf?src-supplier=Avnet, ComponentLink3Description=https://datasheet.ciiva.com/6270/partnumbering-e-01-6270710.pdf?src-supplier=Digi-Key, ComponentLink3URL=https://datasheet.ciiva.com/6270/partnumbering-e-01-6270710.pdf?src-supplier=Digi-Key, ComponentLink4Description=https://datasheet.ciiva.com/16440/l0005e-16440550.pdf?src-supplier=Future+Electronics, ComponentLink4URL=https://datasheet.ciiva.com/16440/l0005e-16440550.pdf?src-supplier=Future+Electronics, Construction=Flat, Depth=0.5mm, Description 1="0402 20 pF 50 V ±2% Tolerance C0G SMT Multilayer Ceramic Capacitor", Height=0.5mm, Lead Free="Lead Free", Length=1mm, Manufacturer Part Number 1=GRM1555C1H200GA01D, Mount="Surface Mount", Packaging="Tape and Reel", Pricing 1="1=0,12, 10=0,05, 50=0,05, 100=0,029, 1000=0,024, 10000=0,02 (USD)", Radiation Hardening=No, RoHS 1=Yes, RoHS Compliant=Yes, Series=GRM, Stock 1=88926, Supplier 1=Mouser, Termination=SMD/SMT, Thickness=0.022inch, Voltage Rating=50V, Voltage Rating (DC)=50V, Width=0.02inch
C13 C23: "Multilayer Ceramic Capacitors MLCC - SMD/SMT 100 pF 50 VDC 5% 0402 C0G (NP0) AEC-Q200", Capacitance=100pF, Case Code (Imperial)=0402, Case Code (Metric)=1005, Dielectric=C0G, Manufacturer 1=Murata, Max Operating Temperature=125°C, Min Operating Temperature=-55°C, Package Quantity=10000, Ratings=AEC-Q200, Supplier Part Number 1=81-GCM1555C1H101JA6D, Tolerance=5%, Voltage=50V, Case/Package=0402, Category 1="Ceramic Capacitors", ComponentLink1Description=https://datasheet.ciiva.com/26889/getdatasheetpartid-748988-26889122.pdf?src-supplier=Verical, ComponentLink1URL=https://datasheet.ciiva.com/26889/getdatasheetpartid-748988-26889122.pdf?src-supplier=Verical, Depth=0.5mm, Description 1="0402 100 pF 50 V ±5 % Tolerance C0G SMT Multilayer Ceramic Capacitor", Height=0.5mm, Lead Free="Lead Free", Length=1mm, Manufacturer Part Number 1=GCM1555C1H101JA16D, Mount="Surface Mount", Packaging="Tape and Reel", Pricing 1="1=0,1, 10=0,023, 50=0,023, 100=0,014, 1000=0,011, 10000=0,006 (USD)", Radiation Hardening=No, Reach SVHC Compliant=No, RoHS 1=Yes, RoHS Compliant=Yes, Series=GCM, Stock 1=5688, Supplier 1=Mouser, Termination=SMD/SMT, Thickness=0.022inch, Voltage Rating=50V, Voltage Rating (DC)=50V, Weight=0.000212oz, Width=0.02inch
C15 C25: "Multilayer Ceramic Capacitors MLCC - SMD/SMT 8.2 pF 50 VDC 0.25 pF 0402 C0G (NP0) AEC-Q200", Manufacturer 1=Murata, Supplier Part Number 1=81-GCM1555C1H8R2CA6J, Category 1="Ceramic Capacitors", Description 1="Cap Auto-grade 8.2PF 50VDC C0G 0.25PF SMD 0402", Manufacturer Part Number 1=GCM1555C1H8R2CA16J, Pricing 1="1=0,1, 10=0,052, 50=0,052, 100=0,024, 1000=0,014, 10000=0,01 (USD)", RoHS 1=Yes, RoHS Compliant=Yes, Stock 1=93627, Supplier 1=Mouser
C16 C22: "CMS 0402 Non Connected"
C17: "Multilayer Ceramic Capacitors MLCC - SMD/SMT 6.8 pF 25 VDC 0.1 pF 0402 C0G (NP0)", Capacitance=6.8pF, Dielectric=C0G, Manufacturer 1=Murata, Supplier Part Number 1=81-GRM1555C1E6R8BA1D, Voltage Rating (DC)=25V, Category 1="Ceramic Capacitors", Description 1="Cap 6.8PF 25VDC C0G 0.1PF SMD 0402 Paper Tape", Length=1mm, Manufacturer Part Number 1=GRM1555C1E6R8BA01D, Pricing 1="1=0,1, 10=0,035, 50=0,035, 100=0,016, 1000=0,009, 10000=0,006 (USD)", RoHS 1=Yes, RoHS Compliant=Yes, Stock 1=8888, Supplier 1=Mouser, Thickness=500um, Width=500um
C18: "Multilayer Ceramic Capacitors MLCC - SMD/SMT 2.7 pF 100 VDC 0.25 pF 0402 C0G (NP0)", Capacitance=2.7pF, Case Code (Imperial)=0402, Case Code (Metric)=1005, Dielectric=C0G, Manufacturer 1=Murata, Max Operating Temperature=125°C, Min Operating Temperature=-55°C, Package Quantity=1, Supplier Part Number 1=81-GRM1555C2A2R7CA1D, Voltage Rating=100V, Case/Package=0402, Category 1="Ceramic Capacitors", ComponentLink1Description=https://datasheet.ciiva.com/18699/partnumbering-e-01-18699287.pdf?src-supplier=Digi-Key, ComponentLink1URL=https://datasheet.ciiva.com/18699/partnumbering-e-01-18699287.pdf?src-supplier=Digi-Key, ComponentLink2Description=https://datasheet.ciiva.com/18699/partnumbering-e-01-18699288.pdf?src-supplier=Digi-Key, ComponentLink2URL=https://datasheet.ciiva.com/18699/partnumbering-e-01-18699288.pdf?src-supplier=Digi-Key, ComponentLink3Description=https://datasheet.ciiva.com/18699/partnumbering-e-01-18699289.pdf?src-supplier=Digi-Key, ComponentLink3URL=https://datasheet.ciiva.com/18699/partnumbering-e-01-18699289.pdf?src-supplier=Digi-Key, ComponentLink4Description=https://datasheet.ciiva.com/24221/c02e-24221449.pdf?src-supplier=Mouser, ComponentLink4URL=https://datasheet.ciiva.com/24221/c02e-24221449.pdf?src-supplier=Mouser, Description 1="Cap Ceramic 2.7pF 100V C0G 0.25pF Pad SMD 0402 125C T/R", Height=0.5mm, Length=0.039inch, Manufacturer Part Number 1=GRM1555C2A2R7CA01D, Mount="Surface Mount", Packaging="Tape and Reel", Pricing 1="1=0,1, 10=0,038, 50=0,038, 100=0,018, 1000=0,01, 10000=0,007 (USD)", RoHS 1=Yes, RoHS Compliant=Yes, Series=GRM, Stock 1=12083, Supplier 1=Mouser, Termination=SMD/SMT, Thickness=0.022inch, Voltage Rating (DC)=100V, Weight=0.000212oz, Width=0.02inch
C24: "Multilayer Ceramic Capacitors MLCC - SMD/SMT 12 pF 50 VDC 2% 0402 C0G (NP0) AEC-Q200", Manufacturer 1=Murata, Manufacturer_Name="Murata Electronics", Supplier Part Number 1=81-GCM1555C1H120GA6D, Arrow Part Number=GCM1555C1H120GA16D, Arrow Price/Stock=https://www.arrow.com/en/products/gcm1555c1h120ga16d/murata-manufacturing?region=nac, Category 1="Ceramic Capacitors", Datasheet Link=https://eu.mouser.com/datasheet/2/281/GCM1555C1H120GA16-01-1064161.pdf, Description 1="Cap Ceramic 12pF 50V C0G 2% Pad SMD 0402 125C Automotive T/R", Height=0.55mm, Manufacturer Part Number 1=GCM1555C1H120GA16D, Manufacturer_Part_Number=GCM1555C1H120GA16D, Pricing 1="1=0,1, 10=0,034, 50=0,034, 100=0,02, 1000=0,016, 10000=0,012 (USD)", RoHS 1=Yes, RoHS Compliant=Yes, Stock 1=28183, Supplier 1=Mouser
C26: "Multilayer Ceramic Capacitors MLCC - SMD/SMT 13 pF 50 VDC 2% 0402 C0G (NP0)", Capacitance=13pF, Case Code (Imperial)=0402, Case Code (Metric)=1005, Dielectric=C0G, Manufacturer 1=Murata, Manufacturer_Name="Murata Electronics", Max Operating Temperature=125°C, Min Operating Temperature=-55°C, Mouser Part Number=81-GRM1555C1H130GA1D, Package Quantity=1, Tolerance=2%, Voltage Rating=50V, Arrow Part Number=GRM1555C1H130GA01D, Arrow Price/Stock=https://www.arrow.com/en/products/grm1555c1h130ga01d/murata-manufacturing, Case/Package=0402, Category 1="Ceramic Capacitors", ComponentLink1Description=https://datasheet.ciiva.com/29540/grm1555c1h130ga01-01-29540650.pdf?src-supplier=Digi-Key, ComponentLink1URL=https://datasheet.ciiva.com/29540/grm1555c1h130ga01-01-29540650.pdf?src-supplier=Digi-Key, ComponentLink2Description=https://datasheet.ciiva.com/5451/product-5451159.pdf?src-supplier=Mouser, ComponentLink2URL=https://datasheet.ciiva.com/5451/product-5451159.pdf?src-supplier=Mouser, ComponentLink3Description=https://datasheet.ciiva.com/29540/partnumbering-e-01-29540651.pdf?src-supplier=Digi-Key, ComponentLink3URL=https://datasheet.ciiva.com/29540/partnumbering-e-01-29540651.pdf?src-supplier=Digi-Key, ComponentLink4Description=https://datasheet.ciiva.com/29540/partnumbering-e-01-29540652.pdf?src-supplier=Digi-Key, ComponentLink4URL=https://datasheet.ciiva.com/29540/partnumbering-e-01-29540652.pdf?src-supplier=Digi-Key, Construction=Flat, Datasheet Link=http://www.murata.com/~/media/webrenewal/support/library/catalog/products/capacitor/mlcc/c02e.pdf, Depth=0.5mm, Description 1="0402 13 pF 50 V ±2% Tolerance C0G SMT Multilayer Ceramic Capacitor", Height=0.55mm, Lead Free="Lead Free", Length=1mm, Manufacturer Part Number 1=GRM1555C1H130GA01D, Manufacturer_Part_Number=GRM1555C1H130GA01D, Material=Ceramic, Mount="Surface Mount", Mouser Price/Stock=https://www.mouser.com/Search/Refine.aspx?Keyword=81-GRM1555C1H130GA1D, Packaging="Tape and Reel", Pricing 1="1=0,13, 10=0,088, 50=0,088, 100=0,042, 1000=0,024, 10000=0,018 (USD)", Radiation Hardening=No, RoHS 1=Yes, RoHS Compliant=Yes, Series=GRM, Stock 1=26120, Supplier 1=Mouser, Supplier Part Number 1=81-GRM1555C1H130GA1D, Termination=SMD/SMT, Thickness=0.022inch, Voltage Rating (DC)=50V, Width=0.5mm
C27: library part GRM0335C1E101FA01J, "Multilayer Ceramic Capacitors MLCC - SMD/SMT 100 pF 25 VDC 1% 0201 C0G (NP0)", Case Code (Imperial)=0201, Case Code (Metric)=0603, Dielectric=C0G, Manufacturer 1=Murata, Max Operating Temperature=125°C, Min Operating Temperature=-55°C, Package Quantity=50000, Supplier Part Number 1=GRM0335C1E101FA01J-ND, Tolerance=1%, Voltage Rating=25V, Capacitance=100pF, Case/Package=0201, Category 1="Ceramic Capacitors", ComponentLink1Description=https://datasheet.ciiva.com/29538/partnumbering-e-01-29538445.pdf?src-supplier=Digi-Key, ComponentLink1URL=https://datasheet.ciiva.com/29538/partnumbering-e-01-29538445.pdf?src-supplier=Digi-Key, Description 1="Cap Cer 100PF 25V NP0 0201", Height=0.3mm, Length=0.6mm, Manufacturer Part Number 1=GRM0335C1E101FA01J, Mount="Surface Mount", Packaging="Tape and Reel", Pricing 1="50000=0,00515 (USD)", RoHS 1=Yes, RoHS Compliant=Yes, Series=GRM, Supplier 1=Digi-Key, Termination=SMD/SMT, Voltage Rating (DC)=25V, Width=0.3mm
C28 C29: "Multilayer Ceramic Capacitors MLCC - SMD/SMT 0201 0.1uF 16volts X5R 10%", Capacitance=100nF, Case Code (Imperial)=0201, Case Code (Metric)=0603, Dielectric=X5R, Manufacturer 1=Murata, Manufacturer_Name="Murata Electronics", Max Operating Temperature=85°C, Min Operating Temperature=-55°C, Mouser Part Number=81-GRM033R61C104KE4D, Tolerance=10%, Voltage Rating=16V, Case/Package=0201, Category 1="Ceramic Capacitors", ComponentLink1Description=http://www.farnell.com/datasheets/2735408.pdf?src-supplier=Farnell, ComponentLink1URL=http://www.farnell.com/datasheets/2735408.pdf?src-supplier=Farnell, ComponentLink2Description=https://search.murata.co.jp/Ceramy/image/img/A01X/G101/ENG/GRM033R61C104KE14-01.pdf?src-supplier=Digi-Key, ComponentLink2URL=https://search.murata.co.jp/Ceramy/image/img/A01X/G101/ENG/GRM033R61C104KE14-01.pdf?src-supplier=Digi-Key, ComponentLink3Description=http://www.farnell.com/datasheets/2735408.pdf?src-supplier=Newark, ComponentLink3URL=http://www.farnell.com/datasheets/2735408.pdf?src-supplier=Newark, ComponentLink4Description=http://search.murata.co.jp/Ceramy/image/img/A01X/G101/ENG/GRM033R61C104KE14-01.pdf?src-supplier=Digi-Key, ComponentLink4URL=http://search.murata.co.jp/Ceramy/image/img/A01X/G101/ENG/GRM033R61C104KE14-01.pdf?src-supplier=Digi-Key, Datasheet Link=http://www.murata.com/~/media/webrenewal/support/library/catalog/products/capacitor/mlcc/c02e.pdf, Description 1="0201 16 V 0.1 uF ±10% Tolerance X5R Dielectric Multilayer Ceramic Chip Capacitor", Geometry.Height=0.33mm, Length=600um, Manufacturer Part Number 1=GRM033R61C104KE14D, Manufacturer_Part_Number=GRM033R61C104KE14D, Mount="Surface Mount", Mouser Price/Stock=https://www.mouser.co.uk/ProductDetail/Murata-Electronics/GRM033R61C104KE14D?qs=jHkklCh7amhDvY8zUHp0eA%3D%3D, Packaging="Tape and Reel", Pricing 1="1=0,1, 10=0,019, 50=0,019, 100=0,011, 1000=0,009, 10000=0,007 (USD)", RoHS 1=Yes, RoHS Compliant=Yes, Series=GRM, Stock 1=2429607, Supplier 1=Mouser, Supplier Part Number 1=81-GRM033R61C104KE4D, Thickness=300um, Voltage Rating (DC)=16V, Width=300um
C30 C35 C42: "Multilayer Ceramic Capacitors MLCC - SMD/SMT 2.2 uF 10 VDC 10% 0402 X7R", Case/Package=0402, Manufacturer 1=Murata, Supplier Part Number 1=81-GRM155Z71A225KE4D, Category 1="Ceramic Capacitors", Description 1="Cap Ceramic 2.2uF 10V X7R 10% Pad SMD 0402 125C T/R", Manufacturer Part Number 1=GRM155Z71A225KE44D, Pricing 1="1=0,19, 10=0,077, 50=0,077, 100=0,047, 1000=0,041, 10000=0,035 (USD)", RoHS 1=Yes, RoHS Compliant=Yes, Stock 1=106743, Supplier 1=Mouser
C34: library part LMK105ABJ474KV8F, "Multilayer Ceramic Capacitors MLCC - SMD/SMT  0.47uF 10V X5R 10% SMD 0402 85°C Paper T/R", Manufacturer 1="Taiyo Yuden", Supplier Part Number 1=963-LMK105ABJ474KV8F, Category 1="Ceramic Capacitors", Description 1="Capacitor Ceramic 0.47uF 10V X5R 10% SMD 0402 85°C Paper T/R", Manufacturer Part Number 1=LMK105ABJ474KV8F, Pricing 1="1=0,1, 10=0,06, 50=0,06, 100=0,028, 1000=0,016, 10000=0,014 (USD)", RoHS 1=Yes, Stock 1=26528, Supplier 1=Mouser
C40 C45: library part CL03A105KP3NSNC, "Multilayer Ceramic Capacitors MLCC - SMD/SMT 1uF+/-10% 10V X5R 06 0201", Manufacturer_Name=SAMSUNG, Mouser Part Number=187-CL03A105KP3NSNC, Datasheet Link=https://datasheet.datasheetarchive.com/originals/distributors/DKDS-19/372696.pdf, Geometry.Height=0.35mm, Manufacturer_Part_Number=CL03A105KP3NSNC, Mouser Price/Stock=https://www.mouser.co.uk/ProductDetail/Samsung-Electro-Mechanics/CL03A105KP3NSNC?qs=47mY1nHWefQ3GOjXGTFrfg%3D%3D
C44: library part GJM1555C1H100FB01D, "Multilayer Ceramic Capacitors MLCC - SMD/SMT 10 pF 50 VDC 1% 0402 C0G (NP0)", Manufacturer_Name="Murata Electronics", Mouser Part Number=81-GJM1555C1H100FB01, Arrow Part Number=GJM1555C1H100FB01D, Arrow Price/Stock=https://www.arrow.com/en/products/gjm1555c1h100fb01d/murata-manufacturing, Datasheet Link=https://www.murata.com/en-eu/products/productdetail?partno=GJM1555C1H100FB01%23, Height=0.55mm, Manufacturer_Part_Number=GJM1555C1H100FB01D, Mouser Price/Stock=https://www.mouser.co.uk/ProductDetail/Murata-Electronics/GJM1555C1H100FB01D?qs=vcjNRp8H9z0fzMnyPuUw%2Fg%3D%3D
C47 C48: library part 0402N5R1B500CT, "Multilayer Ceramic Capacitors MLCC - SMD/SMT 0402 MLCC NPO 5.1 pF, +/- 0.1pF 50 V T&R GP", Manufacturer 1="Walsin Technologies", Supplier Part Number 1=791-0402N5R1B500CT, ComponentLink1Description=https://datasheet.octopart.com/0402N5R1B500CT-Walsin-Technologies-datasheet-136037192.pdf?src-supplier=TECHDesign, ComponentLink1URL=https://datasheet.octopart.com/0402N5R1B500CT-Walsin-Technologies-datasheet-136037192.pdf?src-supplier=TECHDesign, ComponentLink2Description=https://datasheet.octopart.com/0402N5R1B500CT-Walsin-Technologies-datasheet-26371553.pdf, ComponentLink2URL=https://datasheet.octopart.com/0402N5R1B500CT-Walsin-Technologies-datasheet-26371553.pdf, Description 1="Chip Capacitor 0402 MLCC NPO 5.1 pF+/- 0.1pF 50 V T&R GP", Manufacturer Part Number 1=0402N5R1B500CT, Pricing 1="1=0,1, 10=0,048, 50=0,048, 100=0,022, 1000=0,013, 10000=0,008 (USD)", RoHS 1=No, Stock 1=9644, Supplier 1=Mouser
FB1: "Ferrite Bead, 80 Ohm, 25%, 0402 Rohs Compliant: Yes", Manufacturer 1=Murata, Supplier Part Number 1=490-BLM15PE800SH1DCT-ND, Category 1="Ferrite Beads and Chips", Description 1="Ferrite Bead, 80 Ohm, 25%, 0402 Rohs Compliant: Yes", Manufacturer Part Number 1=BLM15PE800SH1D, Pricing 1="1=0,21, 10=0,185, 25=0,1576, 50=0,139, 100=0,1275, 250=0,11588, 500=0,10894, 1000=0,08345, 2500=0,07881 (USD)", RoHS 1=No, Stock 1=1501, Supplier 1=Digi-Key
FB2: library part BLM15BX601SZ1D, "Ferrite Bead 600ohm 500mA 340mOhm 0402", Manufacturer_Name="Murata Electronics", Mouser Part Number=81-BLM15BX601SZ1D, Datasheet Link=http://www.murata.com/~/media/webrenewal/support/library/catalog/products/emc/emifil/c31e.ashx?la=en-gb, Height=0.55mm, Manufacturer_Part_Number=BLM15BX601SZ1D, Mouser Price/Stock=https://www.mouser.com/Search/Refine.aspx?Keyword=81-BLM15BX601SZ1D
L1 L6 L9: library part LQG15HS10NJ02D, "Inductor RF Chip Multi-Layer 10nH 5% 100MHz 8Q-Factor Air 300mA 260mOhm DCR 0402 Paper T/R", Case Code (Imperial)=0402, Case Code (Metric)=1005, Current Rating=300mA, DC Resistance (DCR)=260mR, Manufacturer=Murata, Max Operating Temperature=125°C, Min Operating Temperature=-55°C, Package Quantity=1, Self Resonant Frequency=3.4GHz, Test Frequency=100MHz, Tolerance=5%, Case/Package=0402, Category="Fixed Inductors", ComponentLink1Description=https://datasheet.ciiva.com/11801/0900766b80f10809-11801401.pdf?src-supplier=Rs, ComponentLink1URL=https://datasheet.ciiva.com/11801/0900766b80f10809-11801401.pdf?src-supplier=Rs, ComponentLink2Description=https://datasheet.ciiva.com/1038/l0075s0083lqg15hs-1038119.pdf?src-supplier=Digi-Key, ComponentLink2URL=https://datasheet.ciiva.com/1038/l0075s0083lqg15hs-1038119.pdf?src-supplier=Digi-Key, ComponentLink3Description=https://datasheet.ciiva.com/1038/l0075s0083lqg15hs-1038118.pdf?src-supplier=Digi-Key, ComponentLink3URL=https://datasheet.ciiva.com/1038/l0075s0083lqg15hs-1038118.pdf?src-supplier=Digi-Key, ComponentLink4Description=https://datasheet.ciiva.com/1038/l0075s0083lqg15hs-1038120.pdf?src-supplier=Digi-Key, ComponentLink4URL=https://datasheet.ciiva.com/1038/l0075s0083lqg15hs-1038120.pdf?src-supplier=Digi-Key, ComponentLink5Description=https://datasheet.ciiva.com/8510/l0075s0083lqg15hs-8510813.pdf?src-supplier=Avnet, ComponentLink5URL=https://datasheet.ciiva.com/8510/l0075s0083lqg15hs-8510813.pdf?src-supplier=Avnet, Core Material=Air, DC Current=300mA, Depth=0.55mm, Height=0.5mm, Height - Seated (Max)=0.022inch, Inductance=10nH, Lead Free="Lead Free", Length=0.039inch, Manufacturer Part Number=LQG15HS10NJ02D, Max DC Current=300mA, Military Standard=Not, Mount="Surface Mount", Packaging="Tape and Reel", Pricing 1="10000=0,0139 (USD)", Q Factor=8, Rated Current-Max=300mA, RoHS=Yes, RoHS Compliant=Yes, Series=LQG15HS, Shielding=Unshielded, Stock 1=211215, Supplier 1="Arrow Electronics", Supplier Part Number 1=LQG15HS10NJ02D, Termination=SMD/SMT, Width=0.02inch
L2: library part LQW18AN24NG80D, "Inductor RF Chip Unshielded Wirewound  24nH 2% 100MHz 40Q-Factor Ferrite 1.3A 0603 Paper T/R", Case Code (Imperial)=1608, Case Code (Metric)=0603, Current Rating=1.3A, DC Resistance (DCR)=86mR, Manufacturer 1=Murata, Max Operating Temperature=125°C, Min Operating Temperature=-55°C, Package Quantity=4000, Self Resonant Frequency=3.45GHz, Supplier Part Number 1=81-LQW18AN24NG80D, Test Frequency=100MHz, Tolerance=2%, Case/Package=0603, Category 1="Fixed Inductors", ComponentLink1Description=http://www.mouser.com/ds/2/281/murata_inductors-1115352.pdf?src-supplier=Mouser, ComponentLink1URL=http://www.mouser.com/ds/2/281/murata_inductors-1115352.pdf?src-supplier=Mouser, ComponentLink2Description=https://search.murata.co.jp/Ceramy/image/img/P02/JELF243A-0102.pdf?src-supplier=Digi-Key, ComponentLink2URL=https://search.murata.co.jp/Ceramy/image/img/P02/JELF243A-0102.pdf?src-supplier=Digi-Key, ComponentLink3Description=http://www.murata.com/~/media/webrenewal/support/library/catalog/products/inductor/chip/o05e.ashx?src-supplier=Digi-Key, ComponentLink3URL=http://www.murata.com/~/media/webrenewal/support/library/catalog/products/inductor/chip/o05e.ashx?src-supplier=Digi-Key, Core Material=Ferrite, Description 1="Ind RF Chip Unshielded Wirewound 24nH 2% 100MHz 40Q-Factor Ferrite 1.3A 0603 Paper T/R", Height=0.9mm, Height - Seated (Max)=0.039inch, Inductance=24nH, Length=0.065inch, Manufacturer Part Number 1=LQW18AN24NG80D, Max DC Current=1.3A, Mount="Surface Mount", Packaging="Tape and Reel", Pricing 1="1=0,21, 10=0,145, 50=0,145, 100=0,117, 1000=0,094, 10000=0,072 (USD)", Q Factor=40, RoHS 1=Yes, RoHS Compliant=Yes, Series=LQW18, Shielding=Unshielded, Stock 1=13879, Supplier 1=Mouser, Termination=SMD/SMT, Width=0.8mm
L3: "Inductor Wirewound , 5.6 nH, 40 Milliohm, ± 0.2nH, 6.65 GHz, 1.9 A, 0603 [1608 Metric]", Case Code (Imperial)=0603, Case Code (Metric)=1608, DC Resistance (DCR)=40mR, Inductance=5.6nH, Manufacturer 1=Murata, Max DC Current=1.9A, Max Operating Temperature=125°C, Min Operating Temperature=-55°C, Package Quantity=4000, Self Resonant Frequency=6.65GHz, Supplier Part Number 1=81-LQW18AN5N6C80D, Test Frequency=100MHz, Case/Package=0603, Category 1="Fixed Inductors", ComponentLink1Description=http://www.mouser.com/ds/2/281/o05e-522697.pdf?src-supplier=Mouser, ComponentLink1URL=http://www.mouser.com/ds/2/281/o05e-522697.pdf?src-supplier=Mouser, ComponentLink2Description=http://www.murata.com/~/media/webrenewal/support/library/catalog/products/inductor/chip/o05e.ashx?src-supplier=Digi-Key, ComponentLink2URL=http://www.murata.com/~/media/webrenewal/support/library/catalog/products/inductor/chip/o05e.ashx?src-supplier=Digi-Key, ComponentLink3Description=https://datasheet.octopart.com/LQW18AN5N6C80D-Murata-datasheet-142542865.pdf?src-supplier=Ciiva+Crawler, ComponentLink3URL=https://datasheet.octopart.com/LQW18AN5N6C80D-Murata-datasheet-142542865.pdf?src-supplier=Ciiva+Crawler, ComponentLink4Description=https://datasheet.octopart.com/LQW18AN5N6C80D-Murata-datasheet-141294533.pdf?src-supplier=Ciiva+Crawler, ComponentLink4URL=https://datasheet.octopart.com/LQW18AN5N6C80D-Murata-datasheet-141294533.pdf?src-supplier=Ciiva+Crawler, ComponentLink5Description=https://datasheet.octopart.com/LQW18AN5N6C80D-Murata-datasheet-140717965.pdf?src-supplier=Ciiva+Crawler, ComponentLink5URL=https://datasheet.octopart.com/LQW18AN5N6C80D-Murata-datasheet-140717965.pdf?src-supplier=Ciiva+Crawler, ComponentLink6Description=https://datasheet.octopart.com/LQW18AN5N6C80D-Murata-datasheet-138758991.pdf?src-supplier=Ciiva+Crawler, ComponentLink6URL=https://datasheet.octopart.com/LQW18AN5N6C80D-Murata-datasheet-138758991.pdf?src-supplier=Ciiva+Crawler, ComponentLink7Description=https://datasheet.octopart.com/LQW18AN5N6C80D-Murata-datasheet-145452284.pdf?src-supplier=Geoflip, ComponentLink7URL=https://datasheet.octopart.com/LQW18AN5N6C80D-Murata-datasheet-145452284.pdf?src-supplier=Geoflip, ComponentLink8Description=https://datasheet.octopart.com/LQW18AN5N6C80D-Murata-datasheet-142046223.pdf?src-supplier=Arrow.cn, ComponentLink8URL=https://datasheet.octopart.com/LQW18AN5N6C80D-Murata-datasheet-142046223.pdf?src-supplier=Arrow.cn, Core Material=Ferrite, Description 1="Wirewound Inductor, 5.6 nH, 40 Milliohm, ± 0.2nH, 6.65 GHz, 1.9 A, 0603 [1608 Metric]", Height=0.9mm, Length=1.6mm, Manufacturer Part Number 1=LQW18AN5N6C80D, Mount="Surface Mount", Packaging="Tape and Reel", Pricing 1="1=0,22, 10=0,19, 50=0,19, 100=0,128, 1000=0,09, 10000=0,067 (USD)", Q Factor=38, RoHS Compliant=Yes, Series=LQW18, Shielding=Unshielded, Stock 1=5314, Supplier 1=Mouser, Termination=SMD/SMT, Width=0.8mm